# Altium PCB Switch_Matrix_32_2.PCBDOC (part 9 of 9)
Units mm, origin at the board's own origin, x right, y up, seen from the top; angles counter-clockwise.
Board outline 222.54 x 100 mm, 6 copper layers (L1, P2, L3, P4, L5, L6), stack 1.61 mm thick; 629 components, 583 nets, 2332 pads, 825 vias.
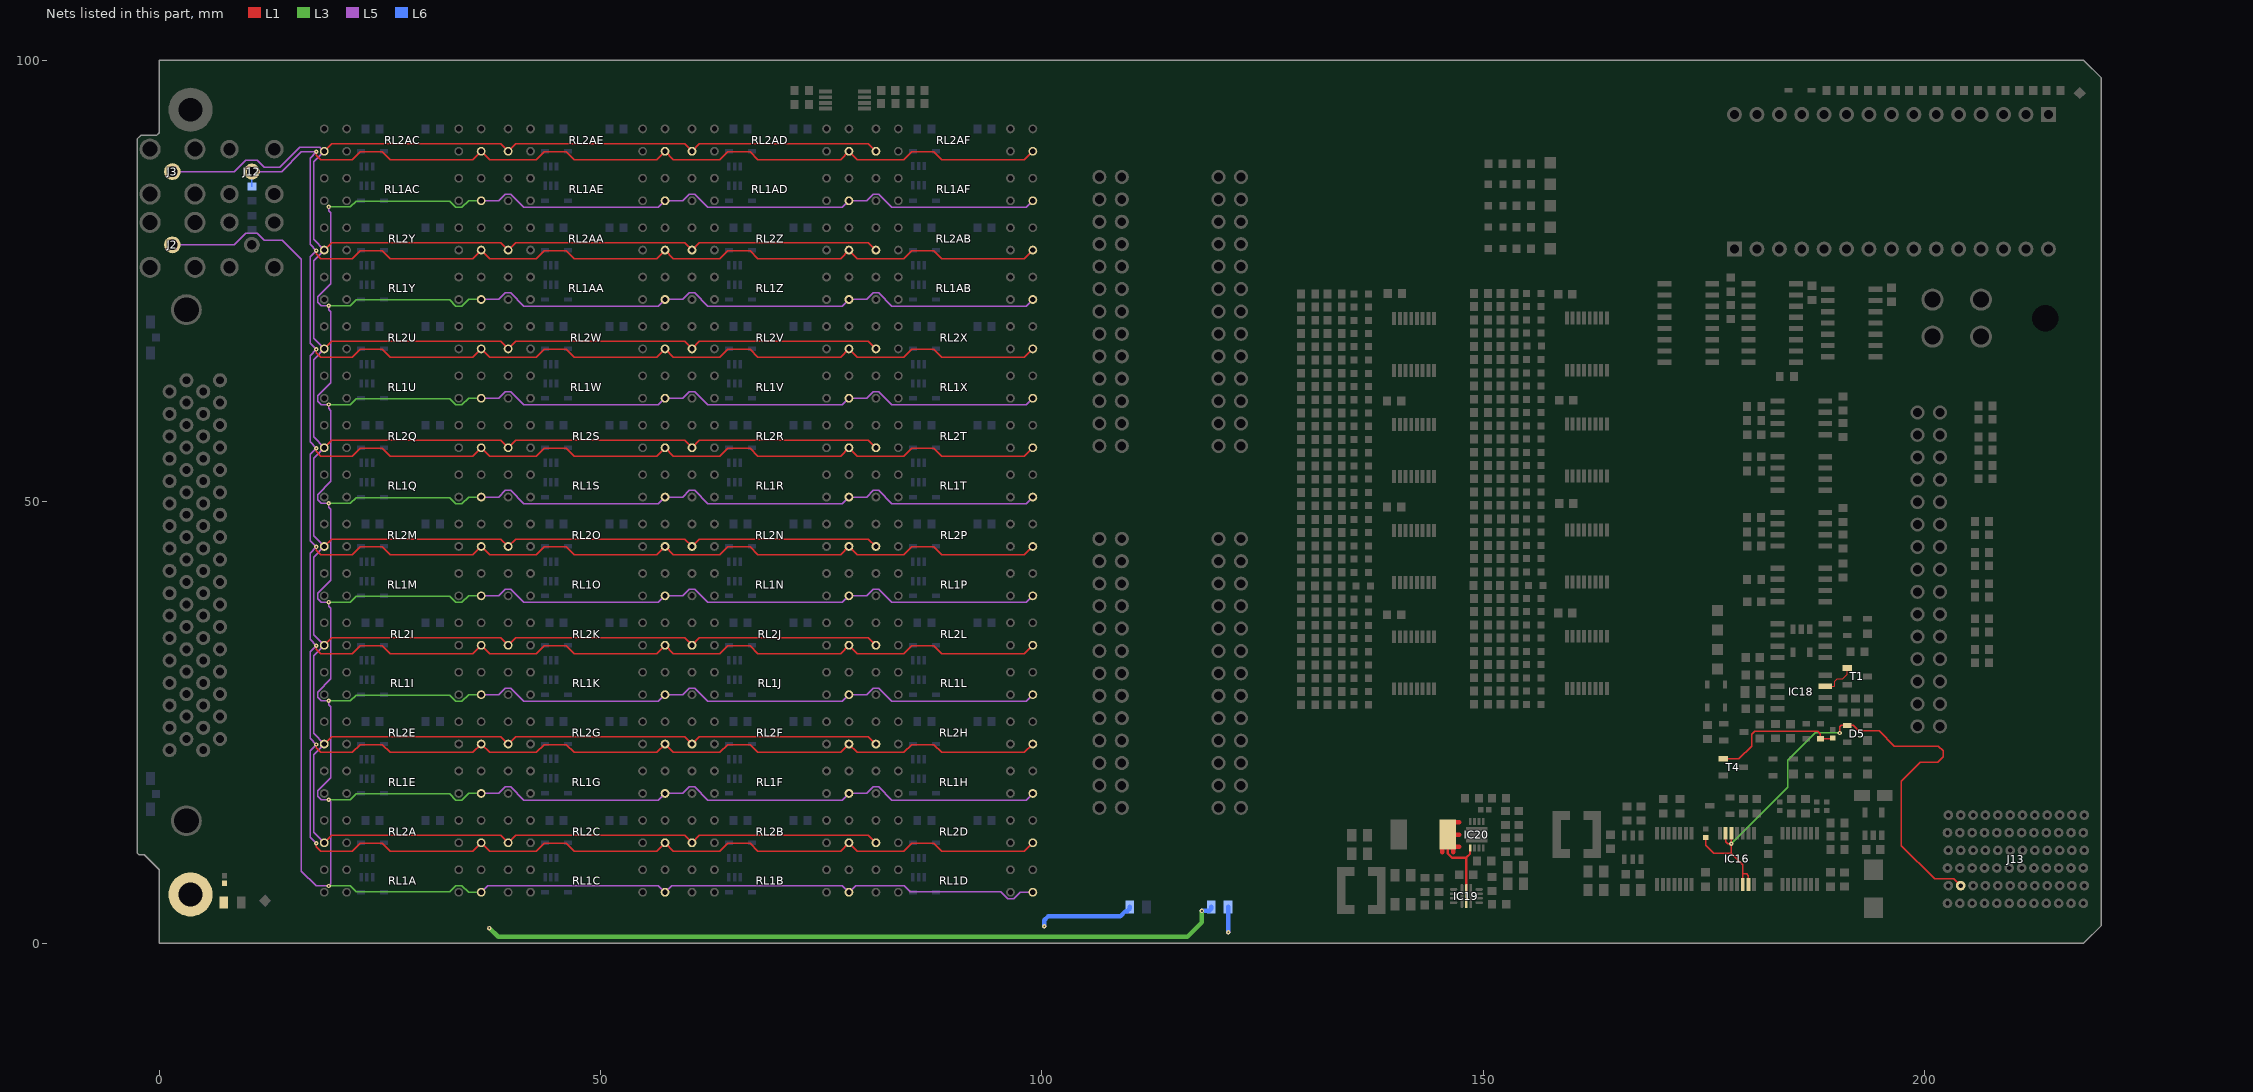
[diagram p12: the nets of this part, all layers, seen from the top]

## Via types
v1: diameter 0.5, hole 0.2, L1 to L6, tented both sides, 775 vias
v2: diameter 0.7, hole 0.4, L1 to L6, tented both sides, 41 vias
v3: diameter 0.5, hole 0.2, L1 to L6, 5 vias
v4: diameter 0.6, hole 0.3, L1 to L6, tented both sides, 4 vias

## Nets (pads, with @x,y where several pads share a name; then routed paths per layer and width w, separated by ;. In a path a pad name is that pad's centre, name@x,y a point inside that pad or via, vN(x,y) a via of type N, cw(c..) or ccw(c..) an arc to the next point about the centre after c; other vN are vias at no path point) (continued)
PORT_NB: J12.1 R100.2 RL2A.4 RL2AA.4 RL2AB.4 RL2AC.4 RL2AD.4 RL2AE.4 RL2AF.4 RL2B.4 RL2C.4 RL2D.4 RL2E.4 RL2F.4 RL2G.4 RL2H.4 RL2I.4 RL2J.4 RL2K.4 RL2L.4 RL2M.4 RL2N.4 RL2O.4 RL2P.4 RL2Q.4 RL2R.4 RL2S.4 RL2T.4 RL2U.4 RL2V.4 RL2W.4 RL2X.4 RL2Y.4 RL2Z.4 | length 792.6
  L1 w0.152: v1(17.803,11.3) 17.803,10.928 18.332,10.4 21.864,10.4 22.764,11.3 25.264,11.3 26.164,10.4 35.518,10.4 RL2A.4@36.474,11.356 37.43,10.4 42.7,10.4 43.6,11.3 46.1,11.3 47,10.4 56.354,10.4 RL2C.4@57.31,11.356 58.266,10.4 63.536,10.4 64.436,11.3 66.936,11.3 67.836,10.4 77.19,10.4 RL2B.4@78.146,11.356 79.102,10.4 84.372,10.4 85.272,11.3 87.772,11.3 88.672,10.4 98.026,10.4 RL2D.4@98.982,11.356 ; v1(17.803,22.492) 17.803,22.12 18.332,21.592 21.864,21.592 22.764,22.492 25.264,22.492 26.164,21.592 35.518,21.592 RL2E.4@36.474,22.548 37.43,21.592 42.7,21.592 43.6,22.492 46.1,22.492 47,21.592 56.354,21.592 RL2G.4@57.31,22.548 58.266,21.592 63.536,21.592 64.436,22.492 66.936,22.492 67.836,21.592 77.19,21.592 RL2F.4@78.146,22.548 79.102,21.592 84.372,21.592 85.272,22.492 87.772,22.492 88.672,21.592 98.026,21.592 RL2H.4@98.982,22.548 ; v1(17.803,33.684) 17.803,33.312 18.332,32.784 21.864,32.784 22.764,33.684 25.264,33.684 26.164,32.784 35.518,32.784 RL2I.4@36.474,33.74 37.43,32.784 42.7,32.784 43.6,33.684 46.1,33.684 47,32.784 56.354,32.784 RL2K.4@57.31,33.74 58.266,32.784 63.536,32.784 64.436,33.684 66.936,33.684 67.836,32.784 77.19,32.784 RL2J.4@78.146,33.74 79.102,32.784 84.372,32.784 85.272,33.684 87.772,33.684 88.672,32.784 98.026,32.784 RL2L.4@98.982,33.74 ; v1@17.803,44.875 17.803,44.504 18.332,43.976 21.864,43.976 22.764,44.876 25.264,44.876 26.164,43.976 35.518,43.976 RL2M.4@36.474,44.932 37.43,43.976 42.7,43.976 43.6,44.876 46.1,44.876 47,43.976 56.354,43.976 RL2O.4@57.31,44.932 58.266,43.976 63.536,43.976 64.436,44.876 66.936,44.876 67.836,43.976 77.19,43.976 RL2N.4@78.146,44.932 79.102,43.976 84.372,43.976 85.272,44.876 87.772,44.876 88.672,43.976 98.026,43.976 RL2P.4@98.982,44.932 ; v1(17.803,56.068) 17.803,55.696 18.332,55.168 21.864,55.168 22.764,56.068 25.264,56.068 26.164,55.168 35.518,55.168 RL2Q.4@36.474,56.124 37.43,55.168 42.7,55.168 43.6,56.068 46.1,56.068 47,55.168 56.354,55.168 RL2S.4@57.31,56.124 58.266,55.168 63.536,55.168 64.436,56.068 66.936,56.068 67.836,55.168 77.19,55.168 RL2R.4@78.146,56.124 79.102,55.168 84.372,55.168 85.272,56.068 87.772,56.068 88.672,55.168 98.026,55.168 RL2T.4@98.982,56.124 ; v1(17.803,67.26) 17.803,66.888 18.332,66.36 21.864,66.36 22.764,67.26 25.264,67.26 26.164,66.36 35.518,66.36 RL2U.4@36.474,67.316 37.43,66.36 42.7,66.36 43.6,67.26 46.1,67.26 47,66.36 56.354,66.36 RL2W.4@57.31,67.316 58.266,66.36 63.536,66.36 64.436,67.26 66.936,67.26 67.836,66.36 77.19,66.36 RL2V.4@78.146,67.316 79.102,66.36 84.372,66.36 85.272,67.26 87.772,67.26 88.672,66.36 98.026,66.36 RL2X.4@98.982,67.316 ; v1(17.803,78.452) 17.803,78.08 18.332,77.552 21.864,77.552 22.764,78.452 25.264,78.452 26.164,77.552 35.518,77.552 RL2Y.4@36.474,78.508 37.43,77.552 42.7,77.552 43.6,78.452 46.1,78.452 47,77.552 56.354,77.552 RL2AA.4@57.31,78.508 58.266,77.552 63.536,77.552 64.436,78.452 66.936,78.452 67.836,77.552 77.19,77.552 RL2Z.4@78.146,78.508 79.102,77.552 84.372,77.552 85.272,78.452 87.772,78.452 88.672,77.552 98.026,77.552 RL2AB.4@98.982,78.508 ; v1(17.803,89.644) 17.803,89.272 18.332,88.744 21.864,88.744 22.764,89.644 25.264,89.644 26.164,88.744 35.518,88.744 RL2AC.4@36.474,89.7 37.43,88.744 42.7,88.744 43.6,89.644 46.1,89.644 47,88.744 56.354,88.744 RL2AE.4@57.31,89.7 58.266,88.744 63.536,88.744 64.436,89.644 66.936,89.644 67.836,88.744 77.19,88.744 RL2AD.4@78.146,89.7 79.102,88.744 84.372,88.744 85.272,89.644 87.772,89.644 88.672,88.744 98.026,88.744 RL2AF.4@98.982,89.7
  L5 w0.152: J12.1@10.5,87.4 13.867,87.4 16.111,89.644 v1(17.803,89.644) 17.095,88.935 17.095,79.16 v1(17.803,78.452) 17.095,77.743 17.095,67.968 v1(17.803,67.26) 17.095,66.551 17.095,56.776 v1(17.803,56.068) 17.095,55.359 17.095,45.584 v1(17.803,44.876) 17.095,44.167 17.095,34.392 v1(17.803,33.684) 17.095,32.975 17.095,23.2 v1(17.803,22.492) 17.095,21.783 17.095,12.008 v1(17.803,11.3)
  L6 w0.152: R100.2@10.5,85.7 J12.1@10.5,87.4
PORT_PA: J2.1 RL1A.4 RL1AA.4 RL1AB.4 RL1AC.4 RL1AD.4 RL1AE.4 RL1AF.4 RL1B.4 RL1C.4 RL1D.4 RL1E.4 RL1F.4 RL1G.4 RL1H.4 RL1I.4 RL1J.4 RL1K.4 RL1L.4 RL1M.4 RL1N.4 RL1O.4 RL1P.4 RL1Q.4 RL1R.4 RL1S.4 RL1T.4 RL1U.4 RL1V.4 RL1W.4 RL1X.4 RL1Y.4 RL1Z.4 | length 850.6
  L5 w0.152: J2.1@1.5,79.1 8.5,79.1 9.8,80.4 11.1,80.4 11.9,79.6 13.96,79.6 16.1,77.46 16.1,8.14 17.775,6.466 v1(19.215,6.466) ; v1@19.215,6.502 19.442,6.729 19.442,15.983 19.215,16.21 v1(19.215,16.246) 18.354,16.246 17.959,16.641 17.959,17.241 19.442,18.723 19.442,26.758 19.215,26.985 v1(19.215,27.438) 18.354,27.438 17.959,27.833 17.959,28.433 19.442,29.915 19.442,37.95 19.215,38.177 v1(19.215,38.63) 18.354,38.63 17.959,39.025 17.959,39.625 19.442,41.107 19.442,49.142 19.215,49.369 v1(19.215,49.822) 18.354,49.822 17.959,50.217 17.959,50.817 19.442,52.299 19.442,60.334 19.215,60.561 v1(19.215,61.014) 18.354,61.014 17.959,61.409 17.959,62.009 19.442,63.491 19.442,71.526 19.215,71.753 v1(19.215,72.206) 18.354,72.206 17.959,72.601 17.959,73.201 19.442,74.683 19.442,82.718 19.215,82.945 v1(19.215,83.398) ; RL1A.4@36.474,5.76 37.218,6.504 56.566,6.504 RL1C.4@57.31,5.76 58.05,6.5 77.406,6.5 RL1B.4@78.146,5.76 78.89,6.504 84.396,6.504 85.1,5.8 95.347,5.8 96.139,5.008 96.808,5.008 97.56,5.76 RL1D.4@98.982,5.76 ; RL1E.4@36.474,16.952 38.464,16.952 39.208,17.696 39.823,17.696 41.319,16.2 56.558,16.2 RL1G.4@57.31,16.952 59.3,16.952 60.044,17.696 60.659,17.696 62.155,16.2 77.394,16.2 RL1F.4@78.146,16.952 80.136,16.952 80.88,17.696 81.495,17.696 82.991,16.2 98.23,16.2 RL1H.4@98.982,16.952 ; RL1I.4@36.474,28.144 38.464,28.144 39.208,28.888 39.823,28.888 41.319,27.392 56.558,27.392 RL1K.4@57.31,28.144 59.3,28.144 60.044,28.888 60.659,28.888 62.155,27.392 77.394,27.392 RL1J.4@78.146,28.144 80.136,28.144 80.88,28.888 81.495,28.888 82.991,27.392 98.23,27.392 RL1L.4@98.982,28.144 ; RL1M.4@36.474,39.336 38.464,39.336 39.208,40.08 39.823,40.08 41.319,38.584 56.558,38.584 RL1O.4@57.31,39.336 59.3,39.336 60.044,40.08 60.659,40.08 62.155,38.584 77.394,38.584 RL1N.4@78.146,39.336 80.136,39.336 80.88,40.08 81.495,40.08 82.991,38.584 98.23,38.584 RL1P.4@98.982,39.336 ; RL1Q.4@36.474,50.528 38.464,50.528 39.208,51.272 39.823,51.272 41.319,49.776 56.558,49.776 RL1S.4@57.31,50.528 59.3,50.528 60.044,51.272 60.659,51.272 62.155,49.776 77.394,49.776 RL1R.4@78.146,50.528 80.136,50.528 80.88,51.272 81.495,51.272 82.991,49.776 98.23,49.776 RL1T.4@98.982,50.528 ; RL1U.4@36.474,61.72 38.464,61.72 39.208,62.464 39.823,62.464 41.319,60.968 56.558,60.968 RL1W.4@57.31,61.72 59.3,61.72 60.044,62.464 60.659,62.464 62.155,60.968 77.394,60.968 RL1V.4@78.146,61.72 80.136,61.72 80.88,62.464 81.495,62.464 82.991,60.968 98.23,60.968 RL1X.4@98.982,61.72 ; RL1Y.4@36.474,72.912 38.464,72.912 39.208,73.656 39.823,73.656 41.319,72.16 56.558,72.16 RL1AA.4@57.31,72.912 59.3,72.912 60.044,73.656 60.659,73.656 62.155,72.16 77.394,72.16 RL1Z.4@78.146,72.912 80.136,72.912 80.88,73.656 81.495,73.656 82.991,72.16 98.23,72.16 RL1AB.4@98.982,72.912 ; RL1AC.4@36.474,84.104 38.464,84.104 39.208,84.848 39.823,84.848 41.319,83.352 56.558,83.352 RL1AE.4@57.31,84.104 59.3,84.104 60.044,84.848 60.659,84.848 62.155,83.352 77.394,83.352 RL1AD.4@78.146,84.104 80.136,84.104 80.88,84.848 81.495,84.848 82.991,83.352 98.23,83.352 RL1AF.4@98.982,84.104
  L3 w0.152: v1(19.215,6.466) 21.646,6.466 22.3,5.812 32.9,5.812 33.6,6.512 34.3,6.512 35.052,5.76 RL1A.4@36.474,5.76 ; v1(19.215,16.246) 21.646,16.246 22.3,16.9 32.9,16.9 33.6,16.2 34.3,16.2 35.052,16.952 RL1E.4@36.474,16.952 ; v1(19.215,27.438) 21.646,27.438 22.3,28.092 32.9,28.092 33.6,27.392 34.3,27.392 35.052,28.144 RL1I.4@36.474,28.144 ; v1(19.215,38.63) 21.646,38.63 22.3,39.284 32.9,39.284 33.6,38.584 34.3,38.584 35.052,39.336 RL1M.4@36.474,39.336 ; v1(19.215,49.822) 21.646,49.822 22.3,50.476 32.9,50.476 33.6,49.776 34.3,49.776 35.052,50.528 RL1Q.4@36.474,50.528 ; v1(19.215,61.014) 21.646,61.014 22.3,61.668 32.9,61.668 33.6,60.968 34.3,60.968 35.052,61.72 RL1U.4@36.474,61.72 ; v1(19.215,72.206) 21.646,72.206 22.3,72.86 32.9,72.86 33.6,72.16 34.3,72.16 35.052,72.912 RL1Y.4@36.474,72.912 ; v1(19.215,83.398) 21.646,83.398 22.3,84.052 32.9,84.052 33.6,83.352 34.3,83.352 35.052,84.104 RL1AC.4@36.474,84.104
PORT_PB: J3.1 RL2A.1 RL2AA.1 RL2AB.1 RL2AC.1 RL2AD.1 RL2AE.1 RL2AF.1 RL2B.1 RL2C.1 RL2D.1 RL2E.1 RL2F.1 RL2G.1 RL2H.1 RL2I.1 RL2J.1 RL2K.1 RL2L.1 RL2M.1 RL2N.1 RL2O.1 RL2P.1 RL2Q.1 RL2R.1 RL2S.1 RL2T.1 RL2U.1 RL2V.1 RL2W.1 RL2X.1 RL2Y.1 RL2Z.1 | length 621.4
  L1 w0.152: RL2A.1@18.694,11.356 19.538,12.2 38.686,12.2 RL2C.1@39.53,11.356 40.374,12.2 59.522,12.2 RL2B.1@60.366,11.356 61.21,12.2 80.358,12.2 RL2D.1@81.202,11.356 ; RL2E.1@18.694,22.548 19.538,23.392 38.686,23.392 RL2G.1@39.53,22.548 40.374,23.392 59.522,23.392 RL2F.1@60.366,22.548 61.21,23.392 80.358,23.392 RL2H.1@81.202,22.548 ; RL2I.1@18.694,33.74 19.538,34.584 38.686,34.584 RL2K.1@39.53,33.74 40.374,34.584 59.522,34.584 RL2J.1@60.366,33.74 61.21,34.584 80.358,34.584 RL2L.1@81.202,33.74 ; RL2M.1@18.694,44.932 19.538,45.776 38.686,45.776 RL2O.1@39.53,44.932 40.374,45.776 59.522,45.776 RL2N.1@60.366,44.932 61.21,45.776 80.358,45.776 RL2P.1@81.202,44.932 ; RL2Q.1@18.694,56.124 19.538,56.968 38.686,56.968 RL2S.1@39.53,56.124 40.374,56.968 59.522,56.968 RL2R.1@60.366,56.124 61.21,56.968 80.358,56.968 RL2T.1@81.202,56.124 ; RL2U.1@18.694,67.316 19.538,68.16 38.686,68.16 RL2W.1@39.53,67.316 40.374,68.16 59.522,68.16 RL2V.1@60.366,67.316 61.21,68.16 80.358,68.16 RL2X.1@81.202,67.316 ; RL2Y.1@18.694,78.508 19.538,79.352 38.686,79.352 RL2AA.1@39.53,78.508 40.374,79.352 59.522,79.352 RL2Z.1@60.366,78.508 61.21,79.352 80.358,79.352 RL2AB.1@81.202,78.508 ; RL2AC.1@18.694,89.7 19.538,90.544 38.686,90.544 RL2AE.1@39.53,89.7 40.374,90.544 59.522,90.544 RL2AD.1@60.366,89.7 61.21,90.544 80.358,90.544 RL2AF.1@81.202,89.7
  L5 w0.152: J3.1@1.5,87.4 8.5,87.4 9.8,88.7 11.1,88.7 11.9,87.9 13.646,87.9 15.898,90.152 18.212,90.152 18.664,89.7 RL2AC.1@18.694,89.7 17.483,88.489 17.483,79.719 RL2Y.1@18.694,78.508 17.483,77.297 17.483,68.527 RL2U.1@18.694,67.316 17.483,66.105 17.483,57.335 RL2Q.1@18.694,56.124 17.483,54.913 17.483,46.143 RL2M.1@18.694,44.932 17.483,43.721 17.483,34.951 RL2I.1@18.694,33.74 17.483,32.529 17.483,23.759 RL2E.1@18.694,22.548 17.483,21.337 17.483,12.567 RL2A.1@18.694,11.356
RST: IC18.3 T1.1 | length 4.1
  L1 w0.127: IC18.3@188.751,29.085 189.776,29.085 189.851,29.16 189.851,29.685 190.116,29.95 190.75,29.95 191.25,30.45 T1.1@191.25,31.15
RSTn: D8.1 R133.1 T4.1 | length 15.2
  L1 w0.152: T4.1@177.2,20.875 178.975,20.875 180.4,22.3 180.4,23.628 180.756,23.985 187.915,23.985 188.2,23.7 D8.1@188.2,23.15 189.52,23.15 R133.1@189.6,23.23
SERVMOD_3V3: D5.3 IC16.5 IC16.6 IC16.12 IC16.13 J13.K2 R85.2 | length 69.4
  L1 w0.152: R85.2@175.2,11.96 175.2,11.1 176.11,10.19 178.109,10.19 ; IC16.6@177.459,12.465 IC16.6@177.459,12.448 177.459,11.465 177.684,11.24 v1(178.109,11.24) ; IC16.5@178.109,12.465 IC16.5@178.109,12.448 v1(178.109,11.24) ; IC16.12@179.409,6.648 179.409,7.873 ; IC16.13@180.059,6.648 180.059,7.648 179.834,7.873 179.409,7.873 ; v1(190.4,23.8) 190.4,24.5 190.55,24.65 D5.3@191.25,24.65 191.95,24.65 192.564,24.036 194.863,24.036 196.579,22.32 201.58,22.32 202.1,21.8 202.1,21.114 201.486,20.5 199.538,20.5 197.391,18.354 197.391,11.03 201.144,7.277 203.323,7.277 J13.K2@204.1,6.5 ; 178.109,10.19 v1(178.109,11.24) ; 178.109,10.19 179.409,8.89 179.409,7.873
  L3 w0.152: v1(178.109,11.24) 184.5,17.631 184.5,20.7 187.6,23.8 v1(190.4,23.8)
STRIP1: B7.1 C212.1 R120.2 R126.1 | length 84.5
  L3 w0.508: v1(37.4,1.7) 38.4,0.7 116.5,0.7 118.132,2.332 v1(118.132,3.643)
  L6 w0.508: v1(118.132,3.643) 118.954,3.643 119.2,3.889 R120.2@119.2,4.1
STRIP2: R119.1 | length 11.1
  L6 w0.508: v1(100.276,1.907) 100.276,2.593 100.701,3.018 108.868,3.018 109.479,3.629 109.704,3.629 109.95,3.875 R119.1@109.95,4.1
STRIP3: R120.1 | length 2.9
  L6 w0.508: R120.1@121.1,4.1 121.1,1.244 v1(121.115,1.229)
Sw_8V0: IC19.2 IC20.1 L1.1 | length 15.7
  L1 w0.254: L1.1@145.992,12.293 145.992,10.143 146.478,9.657 148.092,9.657 ; 148.092,9.689 148.52,10.117 IC20.1@148.52,10.75
  L1 w0.3: IC19.2@148.092,5.325 148.092,9.657
  L1 w0.508: 145.38,10.262 L1.1@145.38,11.762 ; L1.1@145.792,12.293 147.292,12.293 ; L1.1@146.304,10.918 147.31,10.918 ; L1.1@146.304,13.668 147.31,13.668 ; 146.604,10.262 L1.1@146.604,10.918
pads on no net: B1.1 D6.2 FTG1.FTG2 FTG2.1 FTG3.1 FTG4.1 IC3.5 IC3.6 IC5.1 IC5.2 IC5.7 IC6.8 IC6.11 IC14.4 IC15.1 IC15.2 IC15.3 IC15.7 IC19.7 IC20.4 IC32.5 J10.5 J11.3 J11.7 J11.10 J11.11 J11.12 J11.13 J11.15 J13.A5 J13.B1 J13.B5 J13.B6 J13.C6 J13.D5 J13.E2 J13.E4 J13.E5 J13.F2 J13.F4 J13.G3 J13.H3 J13.H6 J13.I2 J13.I6 J13.J3 J13.K3 J13.K6 J13.L2 J13.L3 J13.L6 J14.1 J14.2 J14.3 J14.5 J14.6 J14.7 J14.8 J14.13 LD1.3 LD10.3

## Polygon pours and split planes (outlines as drawn)
GND on L6 "NONET_L-01_P-001" (solid, remove dead copper, pour order 68): 219.5,98 220.039,97.461 220.039,3.039 219.55,2.55 103.956,2.55 103.956,98
P3V3_MP on L6 "P3V3_MP_L06_P067" (solid, remove dead copper, pour order 67): 177.602,2.898 169.702,2.898 169.7,2.9 169.7,27.3 177.7,35.3 190.8,35.3 193.3,37.8 193.3,78.808 189.438,82.67 159.03,82.67 158.429,83.271 158.429,83.758 159.071,84.4 193.8,84.4 198.552,79.648 198.552,63.448 200.2,61.8 200.2,28.46 203,25.66 203,24.021 202.437,23.458 198.942,23.458 195.3,27.1 194.3,26.1 176,26.1 174.6,24.7 174.6,14.623 177.602,11.621
GND on L6 "GND_L06_P030" (solid, remove dead copper, pour order 30): 21.2,88.944 20.9,88.644 20.9,85.341 21.383,84.858 99,84.858 99,88.944
GND on L6 "GND_L06_P029" (solid, remove dead copper, pour order 29): 21.2,77.752 20.9,77.452 20.9,74.149 21.383,73.666 99,73.666 99,77.752
GND on L6 "GND_L06_P028" (solid, remove dead copper, pour order 28): 21.2,66.56 20.9,66.26 20.9,62.957 21.383,62.474 99,62.474 99,66.56
GND on L6 "GND_L06_P027" (solid, remove dead copper, pour order 27): 21.2,55.368 20.9,55.068 20.9,51.765 21.383,51.282 99,51.282 99,55.368
GND on L6 "GND_L06_P026" (solid, remove dead copper, pour order 26): 21.2,44.176 20.9,43.876 20.9,40.573 21.383,40.09 99,40.09 99,44.176
GND on L6 "GND_L06_P025" (solid, remove dead copper, pour order 25): 21.2,32.984 20.9,32.684 20.9,29.381 21.383,28.898 99,28.898 99,32.984
GND on L6 "GND_L06_P018" (solid, remove dead copper, pour order 18): 21.2,21.792 20.9,21.492 20.9,18.189 21.383,17.706 99,17.706 99,21.792
STRIP2 on L6 "esd1" (solid, pour order 11): 83.487,0.962 100.554,0.962 100.554,2.231 45.554,2.231 45.554,0.962
P5V0A on L6 "P5V0A_L06_P050" (solid, remove dead copper, pour order 50): 97,2.9 97,6.081 97.174,6.255 106.955,6.255 107.5,6.8 122.7,6.8 124.5,5 127.8,5 131.8,9 131.8,13.4 134.6,13.4 136,12 136,2.6 122.242,2.6 122.226,2.584 122.226,4.674 121.8,5.1 118.5,5.1 117.7,4.3 117.7,2.6 113.5,2.6 113.5,4.6 113,5.1 109.3,5.1 107.7,3.5 100.3,3.5 99.698,2.898 99,2.898
STRIP3 on L6 "STRIP3_L06_P000" (solid, pour order 0): 218.087,0.962 218.104,0.962 219.344,2.202 120.554,2.202 120.554,0.962
P3V3_DIOT on L6 "P3V3_DIOT_L06_P066" (solid, remove dead copper, pour order 66): 192.8,28.1 190.8,26.1 177.975,26.1 176.128,27.946 175.046,27.946 174.6,27.5 174.6,14.7 177.6,11.7 177.6,2.9 177.602,2.898 196.402,2.898 196.402,23.602 197.5,24.7 194.7,27.5 194.7,32 194.1,32.6 193.1,32.6 192.8,32.3
P12V0 on L6 "P12V0_L06_P059" (solid, remove dead copper, pour order 59): 198.4,2.898 196.402,2.898 196.4,2.9 196.4,23.6 198.157,25.357 199.952,25.357 200.373,24.936 200.373,23.92 200.835,23.458 202.437,23.458 202.974,23.995 202.974,25.233 201.95,26.257 200.513,26.257 200.497,26.273 200.497,28.097 200.497,62.103 198.8,63.8 198.8,75 208.7,75 210.7,73 210.7,31 206.3,26.6 206.3,22.7 205.355,21.755 200.523,21.755 199.942,21.174 199.942,8.282 201.2,7.024 201.2,2.9
GND on L6 "GND_L06_P054" (solid, remove dead copper, pour order 54): 98.5,88.9 98.5,90.844 103.956,96.3 125.5,96.3 130.7,91.1 130.7,77 133.2,74.5 147.9,74.5 148.9,73.5 148.9,27.2 146.5,24.8 132.9,24.8 131.5,23.4 131.5,9.2 127.4,5.1 98.2,5.1
P12V0 on L6 "NONET_L-01_P-001" (solid, remove dead copper, pour order 58): 219.5,7.8 220,7.3 220,3 219.1,2.1 198.4,2.1 198.4,7.8
P13V0_SCSI on L6 "P13V0_SCSI_L06_P032" (solid, remove dead copper, pour order 32): 122.557,46.596 107.317,46.596 107.083,46.362 107.083,43.2 122.501,43.2 123.775,44.474 123.775,46 123.179,46.596
P5V0A on L6 "P5V0A_L06_P031" (solid, remove dead copper, pour order 31): 301 vertices, not listed, extent 14.7,2.8 99,91.344
GND on L6 "GND_L06_P013" (solid, remove dead copper, pour order 13): 21.2,10.6 20.9,10.3 20.9,6.997 21.383,6.514 99,6.514 99,10.6
STRIP1 on L6 "esd1" (solid, pour order 3): 0.804,6.452 7.929,6.452 7.929,2.512 40.554,2.512 40.554,1.012 0.804,1.012
GND on L1 "NONET_L-01_P-001" (solid, remove dead copper, pour order 65): 123.8,97.6 219.7,97.6 219.7,2.6 123.8,2.6
P3V3 on L1 "P3V3_L01_P064" (solid, remove dead copper, pour order 64): 162.4,5.308 162.4,9 162.2,9.2 160.1,9.2 159.85,9.45 159.85,14.943 157.143,14.943 156.6,14.4 156.6,5.655 157.044,5.21 162.302,5.21
P12V0 on L1 "P12V0_L01_P063" (solid, remove dead copper, pour order 63): 148.825,9.8 148.825,8.925 148.417,8.517 148.417,6.575 148.742,6.25 148.742,6.209 149.534,7 150.1,7 150.3,6.8 151.6,6.8 151.8,6.6 151.8,5.7 152.4,5.1 153.6,5.1 153.9,4.8 153.9,3.7 153.761,3.561 149.939,3.561 149.7,3.8 149.171,3.8 148.729,4.242 148.484,4.242 148.484,4.141 148.442,4.1 148.442,2.569 148.474,2.537 217.3,2.537 217.3,4.945 156.873,4.945 156.118,5.7 154.1,5.7 153.851,5.949 153.851,9.279 153.506,9.625 152.297,9.625 151.99,9.318 151.99,8.699 151.831,8.54 150.144,8.54 149.775,8.909 149.775,9.8
GND on L1 "GND_L01_P062" (solid, remove dead copper, pour order 62): 148.045,13.125 148.045,11.375 150.495,11.375 150.495,10.495 150.425,10.425 150.425,8.8 151.375,8.8 151.7,9.125 151.7,12.8 151.375,13.125 150.495,13.125
Sw_8V0 on L1 "SW_8V0_L01_P061" (solid, remove dead copper, pour order 61): 145.067,13.993 145.067,9.333 145.7,8.7 147.512,8.7 147.999,8.213 148.234,8.447 148.234,8.775 148.67,9.211 148.67,11.15 148.37,11.15 148.37,10.35 147.85,10.35 147.6,10.6 147.6,13.8 147.4,14 147.393,13.993 146.917,13.993
NetC11_2 on L1 "NETC11_2_L01_P060" (solid, remove dead copper, pour order 60): 136.725,3.307 140.525,3.307 140.525,8.702 140.829,9.002 141.367,9.533 141.367,15.7 138.45,15.7 136.725,13.975
P5V0A on L1 "P5V0A_L01_P052" (solid, remove dead copper, pour order 52): 135.625,3.307 132.593,3.307 131.7,4.2 131.7,13 132.7,14 135.6,14 135.625,13.975
P13V0_SCSI on L1 "P13V0_SCSI_L01_P015" (solid, remove dead copper, pour order 15): 135.5,24.386 135.5,20.017 135.238,19.755 123.8,19.755 123.8,43.626 123.212,44.214 121.486,44.214 120.961,44.739 120.961,52.866 123.729,55.634 123.729,84.693 123.169,85.253 108.019,85.253 107.444,85.828 107.444,90.2 127.867,90.2 127.867,26.133 129.3,24.7 135.186,24.7
STRIP1 on L1 "esd1" (solid, pour order 10): 0.804,7.037 7.929,7.037 7.929,2.512 40.554,2.512 40.554,1.012 0.804,1.012
STRIP3 on L1 "STRIP3_L01_P014" (solid, pour order 14): 218.087,0.962 218.104,0.962 219.344,2.202 120.554,2.202 120.554,0.962
STRIP2 on L1 "esd1" (solid, pour order 7): 83.487,0.962 100.554,0.962 100.554,2.231 45.554,2.231 45.554,0.962
GND on L3 "tgr" (solid, remove dead copper, pour order 69): 104.2,98 104.2,87.6 127.8,87.6 127.8,12.967 117.465,12.967 107.398,2.9 127.8,2.9 219.7,2.9 219.7,97.8 219.5,98
N13V0_SCSI on L3 "N13V0_SCSI_L03_P008" (solid, remove dead copper, pour order 8): 127.867,26.133 127.867,12.967 125.1,10.2 114.7,10.2 107.2,2.7 12.3,2.7 8.4,2.7 8.4,6.8 5.2,10 -1.7,10 -2.5,10 -2.5,46.504 2.705,46.504 4.38,44.829 4.38,42.197 2.388,40.204 0.614,40.197 0.614,21.879 17.093,5.4 104.3,5.4 112.9,14 122.739,14 123.8,15.061 123.8,43.626 123.212,44.214 119.186,44.214 118.2,45.2 118.2,50.105 123.729,55.634 123.729,84.693 123.169,85.253 111.974,85.253 111.027,86.2 104.7,86.2 104.2,86.7 104.2,90 125.6,90 127.867,87.733
P3V3 on L3 "P3V3_L03_P053" (solid, remove dead copper, pour order 53): 160.9,5.1 157.211,5.1 156.555,5.755 156.555,20.645 153.9,23.3 141.5,23.3 138.8,26 138.8,72.48 139.02,72.7 144.5,72.7 145,72.2 145,34.17 146.17,33 156.7,33 158.1,34.4 158.1,72 158.9,72.8 163.6,72.8 164.5,71.9 164.5,33.568 165.568,32.5 173.1,32.5 181,40.4 181,70.9 182.7,72.6 182.7,74.2 185.337,76.837 185.337,77.308 185.052,77.593 183.693,77.593 181.2,75.1 178.7,75.1 178.52,75.28 178.52,75.602 178.715,75.797 180.697,75.797 181.797,76.897 181.797,80.103 183.088,81.395 196.505,81.395 198.1,79.8 198.1,75.3 195.4,72.6 187.2,72.6 186.3,71.7 186.3,36 176.3,26 167.979,26 167.702,25.723 167.702,20.398 169.6,18.5 180.268,18.5 181.298,17.469 181.298,17.154 181.145,17 180.825,17 180.025,17.8 169.5,17.8 162.8,11.1 162.8,5.8 162.1,5.1
GND on L5 "GND_L05_P081" (solid, remove dead copper, pour order 81): 18.34,91.16 25.9,91.16 26.1,90.96 35.6,90.96 35.8,91.16 46.736,91.16 46.936,90.96 56.436,90.96 56.636,91.16 67.572,91.16 67.772,90.96 77.272,90.96 77.472,91.16 88.408,91.16 88.608,90.96 98.108,90.96 98.308,91.16 99.3,91.16 99.9,91.76 99.9,93.06 99.4,93.56 18.36,93.56 17.8,93 17.8,91.7
GND on L5 "GND_L05_P080" (solid, remove dead copper, pour order 80): 18.32,79.968 25.9,79.968 26.1,79.768 35.6,79.768 35.8,79.968 46.736,79.968 46.936,79.768 56.436,79.768 56.636,79.968 67.572,79.968 67.772,79.768 77.272,79.768 77.472,79.968 88.408,79.968 88.608,79.768 98.108,79.768 98.308,79.968 99.3,79.968 99.9,80.568 99.9,81.868 99.4,82.368 20.423,82.368 19.9,81.845 18.32,81.845
GND on L5 "GND_L05_P079" (solid, remove dead copper, pour order 79): 18.32,68.776 25.9,68.776 26.1,68.576 35.6,68.576 35.8,68.776 46.736,68.776 46.936,68.576 56.436,68.576 56.636,68.776 67.572,68.776 67.772,68.576 77.272,68.576 77.472,68.776 88.408,68.776 88.608,68.576 98.108,68.576 98.308,68.776 99.3,68.776 99.9,69.376 99.9,70.676 99.4,71.176 20.423,71.176 19.9,70.653 18.32,70.653
GND on L5 "GND_L05_P078" (solid, remove dead copper, pour order 78): 18.32,57.584 25.9,57.584 26.1,57.384 35.6,57.384 35.8,57.584 46.736,57.584 46.936,57.384 56.436,57.384 56.636,57.584 67.572,57.584 67.772,57.384 77.272,57.384 77.472,57.584 88.408,57.584 88.608,57.384 98.108,57.384 98.308,57.584 99.3,57.584 99.9,58.184 99.9,59.484 99.4,59.984 20.423,59.984 19.9,59.461 18.32,59.461
GND on L5 "GND_L05_P077" (solid, remove dead copper, pour order 77): 18.32,46.392 25.9,46.392 26.1,46.192 35.6,46.192 35.8,46.392 46.736,46.392 46.936,46.192 56.436,46.192 56.636,46.392 67.572,46.392 67.772,46.192 77.272,46.192 77.472,46.392 88.408,46.392 88.608,46.192 98.108,46.192 98.308,46.392 99.3,46.392 99.9,46.992 99.9,48.292 99.4,48.792 20.423,48.792 19.9,48.269 18.32,48.269
GND on L5 "GND_L05_P076" (solid, remove dead copper, pour order 76): 18.32,12.816 25.9,12.816 26.1,12.616 35.6,12.616 35.8,12.816 46.736,12.816 46.936,12.616 56.436,12.616 56.636,12.816 67.572,12.816 67.772,12.616 77.272,12.616 77.472,12.816 88.408,12.816 88.608,12.616 98.108,12.616 98.308,12.816 99.3,12.816 99.9,13.416 99.9,14.716 99.4,15.216 20.423,15.216 19.9,14.693 18.32,14.693
GND on L5 "GND_L05_P075" (solid, remove dead copper, pour order 75): 18.32,24.008 25.9,24.008 26.1,23.808 35.6,23.808 35.8,24.008 46.736,24.008 46.936,23.808 56.436,23.808 56.636,24.008 67.572,24.008 67.772,23.808 77.272,23.808 77.472,24.008 88.408,24.008 88.608,23.808 98.108,23.808 98.308,24.008 99.3,24.008 99.9,24.608 99.9,25.908 99.4,26.408 20.423,26.408 19.9,25.885 18.32,25.885
GND on L5 "GND_L05_P074" (solid, remove dead copper, pour order 74): 18.32,35.2 25.9,35.2 26.1,35 35.6,35 35.8,35.2 46.736,35.2 46.936,35 56.436,35 56.636,35.2 67.572,35.2 67.772,35 77.272,35 77.472,35.2 88.408,35.2 88.608,35 98.108,35 98.308,35.2 99.3,35.2 99.9,35.8 99.9,37.1 99.4,37.6 20.423,37.6 19.9,37.077 18.32,37.077
GND on L5 "NONET_L-01_P-001" (solid, remove dead copper, pour order 57): 137.7,99.8 217.5,99.8 219.8,97.5 219.8,2.4 137.7,2.4
N13V0_SCSI on L5 "N13V0_SCSI_L05_P056" (solid, remove dead copper, pour order 56): 106.517,46.596 121.757,46.596 121.992,46.362 121.992,43.2 106.574,43.2 105.3,44.474 105.3,46 105.896,46.596
P13V0_SCSI on L5 "P13V0_SCSI_L05_P002" (solid, remove dead copper, pour order 2): 5.599,44.829 5.599,42.197 8.2,39.596 8.2,2.6 137.4,2.6 137.4,24.65 133.051,24.65 131.806,23.406 131.806,9.406 127.3,4.9 98.9,4.9 80.8,4.9 16.7,4.9 14.3,7.3 14.3,43.5 11.296,46.504 7.274,46.504
GND on P4 (split plane): 219.528,97.789 219.528,2.211 217.828,0.51 0.51,0.51 0.51,8.3 0.501,8.4 0.472,8.495 0.424,8.584 0.361,8.661 -0.039,9.061 -1.339,10.361 -1.416,10.424 -1.505,10.472 -1.6,10.501 -1.7,10.51 -1.99,10.51 -1.99,90.889 -1.889,90.99 -0.3,90.99 -0.2,90.999 -0.105,91.028 -0.016,91.076 0.061,91.139 0.361,91.439 0.424,91.516 0.472,91.605 0.501,91.7 0.51,91.8 0.51,99.49 217.828,99.49
GND on P2 (split plane): 219.528,97.789 219.528,2.211 217.828,0.51 0.51,0.51 0.51,8.3 0.501,8.4 0.472,8.495 0.424,8.584 0.361,8.661 -0.039,9.061 -1.339,10.361 -1.416,10.424 -1.505,10.472 -1.6,10.501 -1.7,10.51 -1.99,10.51 -1.99,90.889 -1.889,90.99 -0.3,90.99 -0.2,90.999 -0.105,91.028 -0.016,91.076 0.061,91.139 0.361,91.439 0.424,91.516 0.472,91.605 0.501,91.7 0.51,91.8 0.51,99.49 217.828,99.49

## Keep-outs
L1:
  lines w0.1: 0.004,8.103 1,8.103 1.996,8.103 ccw(c1.996,8.61) 2.355,8.251 cw(c2.357,8.249) 2.357,8.252 4.09,8.252 cw(c4.09,6.025) 5.665,7.6 6.187,7.078 cw(c5.64,6.531) 6.413,6.531 ; 0.69,91.923 2,91.923 2.423,91.5 5.389,91.5 6.581,92.692 6.581,94 6.581,95 6.581,95.606 6.096,96.091 6.096,97.003
  lines w0.2: 8.229,2.537 219.3,2.537
  lines w0.254: 0.051,97.993 159.791,97.993 219.8,97.993 ; 8.188,2.612 8.188,6.8
L5:
  lines w0.2: 8.229,2.537 219.3,2.537
  lines w0.254: 0.051,97.993 159.791,97.993 219.593,97.993
L3:
  lines w0.2: 8.229,2.537 117.416,2.537 ; 118.937,2.537 219.3,2.537
  lines w0.254: 0.051,97.993 159.791,97.993 220.2,97.993
L6:
  lines w0.1: 1,8.103 2.35,8.103 2.538,8.29 4.975,8.29 6.413,6.852 6.413,4.256 6.096,3.939 6.096,2.855 6.414,2.537 8.229,2.537 ; 1,91.923 2,91.923 2.423,91.5 5.32,91.5 6.581,92.761 6.581,95.606 6.096,96.091 6.096,97.003
  lines w0.2: 8.229,2.537 99.6,2.537 ; 101,2.537 119.984,2.537 ; 122.216,2.537 219.3,2.537
  lines w0.254: 0.051,97.993 219.9,97.993
KeepOutLayer:
  circle w0.254: c213.7,70.8 r2.002
  region: 206.037,48.55 219.475,48.55 219.475,51.45 206.037,51.45
  lines w0.2: 218,100 220.039,97.961 220.039,2.55
  lines w0.203: 0.2,93.1 0.2,99.75 0.45,100 19,100 218,100

## Other copper
L1:
  pour cut-out: 162.125,15.2 159.025,15.2 159.025,10.436 162.125,10.436
  pour cut-out: 137.7,8.613 134.6,8.613 134.6,2.848 137.7,2.848
  pour cut-out: 141.7,9.1 144.8,9.1 144.8,14.3 146.4,14.3 146.4,15.9 144.8,15.9 142.7,15.9 141.7,14.9
L6:
  rectangle net GND: -1.8,71.075 -1,71.6
  rectangle net GND: -1.9,69.346 -1.164,69.9
  rectangle net GND: -0.8,70.9 -0.2,71.5
  pour cut-out: 122.994,55.262 123.611,55.88 123.611,87.233 122.994,87.85 120.883,87.85 119.581,87.85 118.963,87.233 118.963,55.88 119.581,55.262
  pour cut-out: 109.494,55.262 110.111,55.88 110.111,87.233 109.494,87.85 107.383,87.85 106.081,87.85 105.463,87.233 105.463,55.88 106.081,55.262
  pour cut-out: 119.581,14.262 118.963,14.88 118.963,42.941 118.972,42.95 121.625,42.95 121.931,43.256 123.611,43.256 123.611,14.88 122.994,14.262
  pour cut-out: 109.494,14.262 110.111,14.88 110.111,42.941 110.103,42.95 107.45,42.95 106.8,43.6 106.824,43.624 106.824,46.292 107.383,46.85 106.081,46.85 105.463,46.233 105.463,14.88 106.081,14.262

## Silkscreen, mask and mechanical layers (free items; w line width, h text height)
TopOverlay:
  drawing of 1255 lines, arcs and shapes, not listed
  text "PORTB" at 9.154,93.854 h1.52
  text "P" at 9.354,91.534 h1.52
  text "N" at 13.154,91.534 h1.52
  text "GND" at 158.9,87.7 h1
  text "P3V3" at 158.9,85.3 h1
  text "P3V3MP" at 158.9,82.8 h1
  text "P5V0" at 158.9,80.4 h1
  text "Switch Matrix 32:2  / V1.2 / WUT ISE 2026" at 127.4,78.9 h1.02
  text "P12V0" at 158.9,77.967 h1
  text "PORTA" at 133.952,74.752 h0.89
  text "PORTB" at 153.552,74.652 h0.89
  text "P" at 9.354,73.154 h1.52
  text "N" at 13.154,73.154 h1.52
  text "CH31" at 126.006,73.152 h0.76
  text "CH30" at 125.752,71.552 h0.76
  text "PORTA" at 9.154,70.754 h1.52
  text "CH29" at 125.752,70.152 h0.76
  text "CH28" at 125.752,68.652 h0.76
  text "CH27" at 125.752,67.152 h0.76
  text "CH26" at 125.752,65.552 h0.76
  text "P12V in" at 208.452,65.052 h0.89
  text "CH25" at 125.752,64.052 h0.76
  text "CH24" at 125.752,62.552 h0.76
  text "DAC 24-31" at 103.005,61.7 h2.03 r90
  text "DAC 16-23" at 116.2,61.7 h2.03 r90
  text "CH23" at 125.752,61.052 h0.76
  text "CH22" at 125.752,59.552 h0.76
  text "CH21" at 126.006,58.052 h0.76
  text "CH20" at 125.752,56.652 h0.76
  text "CH19" at 125.879,55.052 h0.76
  text "CH18" at 125.879,53.552 h0.76
  text "CH17" at 125.879,52.052 h0.76
  text "EEM 0" at 195.2,50.7 h1.52 r90
  text "CH16" at 125.879,50.552 h0.76
  text "CH15" at 125.879,49.052 h0.76
  text "CH14" at 125.879,47.552 h0.76
  text "CH13" at 125.879,46.052 h0.76
  text "CH12" at 125.879,44.552 h0.76
  text "CH11" at 126.133,43.052 h0.76
  text "CH10" at 125.879,41.552 h0.76
  text "CH9" at 126.514,40.152 h0.76
  text "CH8" at 126.514,38.552 h0.76
  text "CH7" at 126.514,37.052 h0.76
  text "GND" at 172.1,36.96 h1
  text "CH6" at 126.514,35.552 h0.76
  text "SDA" at 172.1,34.76 h1
  text "CH5" at 126.514,34.052 h0.76
  text "CH4" at 126.514,32.552 h0.76
  text "SCL" at 172.1,32.56 h1
  text "CH3" at 126.514,31.052 h0.76
  text "P3V3_MP" at 168.101,30.36 h1
  text "CH2" at 126.514,29.552 h0.76
  text "CH1" at 126.768,28.052 h0.76
  text "CH0" at 126.514,26.552 h0.76
  text "DAC 0-7" at 103.005,23.137 h2.03 r90
  text "DAC 8-15" at 115.8,22 h2.03 r90
BottomOverlay:
  drawing of 1237 lines, arcs and shapes, not listed
  text "Switch Matrix 32:2  / V1.2 / WUT ISE 2026" at 148.762,78.777 h1.02
TopSolder:
  rectangle: 5.004,0.565 219.973,2.362
  rectangle: 3.354,0.565 5.531,2.337
  rectangle: 1.177,0.565 3.354,2.362
BottomSolder:
  rectangle: 4.923,0.565 219.973,2.362
  rectangle: 3.354,0.565 5.531,2.337
  rectangle: 1.177,0.565 3.354,2.362
Mechanical1:
  drawing of 415 lines, arcs and shapes, not listed
  text "Layer" at 50.104,161.734 h1.52
  text "Name" at 60.516,161.734 h1.52
  text "Material" at 82.608,161.734 h1.52
  text "Thickness" at 104.446,161.734 h1.52
  text "Constant" at 120.952,161.734 h1.52
  text "Board Layer Stack" at 135.426,161.734 h1.52
  text "TopOverlay" at 60.516,158.686 h1.52
  text "TopSolder" at 60.516,155.638 h1.52
  text "Solder Resist" at 82.608,155.638 h1.52
  text "0.010mm" at 104.446,155.638 h1.52
  text "3.5" at 120.952,155.638 h1.52
  text "1" at 50.104,152.59 h1.52
  text "L1" at 60.516,152.59 h1.52
  text "0.035mm" at 104.446,152.59 h1.52
  text "Dielectric1" at 60.516,149.542 h1.52
  text "FR-4" at 82.608,149.542 h1.52
  text "0.200mm" at 104.446,149.542 h1.52
  text "4.8" at 120.952,149.542 h1.52
  text "2" at 50.104,146.494 h1.52
  text "P2" at 60.516,146.494 h1.52
  text "CF-004" at 82.608,146.494 h1.52
  text "0.035mm" at 104.446,146.494 h1.52
  text "Dielectric 1" at 60.516,143.446 h1.52
  text "PP-006" at 82.608,143.446 h1.52
  text "0.400mm" at 104.446,143.446 h1.52
  text "4.1" at 120.952,143.446 h1.52
  text "3" at 50.104,140.398 h1.52
  text "L3" at 60.516,140.398 h1.52
  text "CF-004" at 82.608,140.398 h1.52
  text "0.035mm" at 104.446,140.398 h1.52
  text "Dielectric 2" at 60.516,137.35 h1.52
  text "PP-006" at 82.608,137.35 h1.52
  text "0.200mm" at 104.446,137.35 h1.52
  text "4.1" at 120.952,137.35 h1.52
  text "4" at 50.104,134.302 h1.52
  text "P4" at 60.516,134.302 h1.52
  text "CF-004" at 82.608,134.302 h1.52
  text "0.035mm" at 104.446,134.302 h1.52
  text "Dielectric2" at 60.516,131.254 h1.52
  text "Core-042" at 82.608,131.254 h1.52
  text "0.400mm" at 104.446,131.254 h1.52
  text "4.6" at 120.952,131.254 h1.52
  text "5" at 50.104,128.206 h1.52
  text "L5" at 60.516,128.206 h1.52
  text "CF-004" at 82.608,128.206 h1.52
  text "0.035mm" at 104.446,128.206 h1.52
  text "Dielectric3" at 60.516,125.158 h1.52
  text "FR-4" at 82.608,125.158 h1.52
  text "0.200mm" at 104.446,125.158 h1.52
  text "4.8" at 120.952,125.158 h1.52
  text "6" at 50.104,122.11 h1.52
  text "L6" at 60.516,122.11 h1.52
  text "0.035mm" at 104.446,122.11 h1.52
  text "BottomSolder" at 60.516,119.062 h1.52
  text "Solder Resist" at 82.608,119.062 h1.52
  text "0.010mm" at 104.446,119.062 h1.52
  text "3.5" at 120.952,119.062 h1.52
  text "BottomOverlay" at 60.516,116.014 h1.52
  text "Total board thickness:" at 50.104,112.966 h1.52
  text "1.630mm" at 104.446,112.966 h1.52
Mechanical4:
  lines w0.508: -2.544,-15.25 -2.544,114.162

## Text inside footprints (layer, text, board x,y; h text height)
J1: TopOverlay "36" at 2.689,21.311 h1 r270; TopOverlay "1" at 4.489,20.411 h1 r270; TopOverlay "2" at 6.439,21.311 h1 r270; TopOverlay "35" at 0.539,20.411 h1 r270; TopOverlay "34" at 6.374,67.261 h1 r270; TopOverlay "67" at 0.675,66.161 h1 r270; TopOverlay "68" at 2.424,67.061 h1 r270; TopOverlay "33" at 4.424,66.461 h1 r270; Mechanical14 "36" at 2.689,21.311 h1.02 r270; Mechanical14 "1" at 4.489,20.411 h1.02 r270; Mechanical14 "2" at 6.439,21.311 h1.02 r270; Mechanical14 "35" at 0.539,20.411 h1.02 r270; Mechanical14 "34" at 6.374,67.261 h1.02 r270; Mechanical14 "67" at 0.675,66.161 h1.02 r270; Mechanical14 "68" at 2.424,67.061 h1.02 r270; Mechanical14 "33" at 4.424,66.461 h1.02 r270; Mechanical8 "PCB Edge" at -2.165,47.131 h1.2 r270
J4: TopOverlay "26" at 118.62,45.161 h1.02 r90; Mechanical14 "26" at 118.62,45.161 h1.02 r90
J5: TopOverlay "26" at 118.62,86.161 h1.02 r90; Mechanical14 "26" at 118.62,86.161 h1.02 r90
J6: TopOverlay "30" at 203.147,25.185 h1.02 r270; Mechanical14 "30" at 203.147,25.185 h1.02 r270
J7: TopOverlay "26" at 105.12,86.161 h1.02 r90; Mechanical14 "26" at 105.12,86.161 h1.02 r90
J8: TopOverlay "26" at 105.12,45.161 h1.02 r90; Mechanical14 "26" at 105.12,45.161 h1.02 r90
J10: TopOverlay "1" at 205.45,75.275 h1.2 r270; Mechanical14 "1" at 205.45,75.275 h1.2 r270
J13: TopOverlay "A" at 219.1,2.9 h1 r90; TopOverlay "B" at 217.7,2.9 h1 r90; TopOverlay "C" at 216.4,2.8 h1 r90; TopOverlay "D" at 214.3,2.3 h1 r90; TopOverlay "E" at 212.9,2.3 h1 r90; TopOverlay "F" at 211.5,2.3 h1 r90; TopOverlay "G" at 210.1,2.3 h1 r90; TopOverlay "H" at 208.7,2.3 h1 r90; TopOverlay "I" at 207.3,2.55 h1 r90; TopOverlay "J" at 205.9,2.3 h1 r90; TopOverlay "K" at 204.5,2.3 h1 r90; TopOverlay "L" at 203.1,2.3 h1 r90; TopOverlay "1" at 198.05,4.15 h1 r90; TopOverlay "2" at 198.05,6.15 h1 r90; TopOverlay "3" at 198.05,8.15 h1 r90; TopOverlay "4" at 198.05,10.15 h1 r90; TopOverlay "5" at 198.05,12.15 h1 r90; TopOverlay "6" at 198.05,14.15 h1 r90; DrillDrawing "PRESS-FIT TECHNOLOGY" at 218.75,17 h1 r180; DrillDrawing "Diam. 0.5mm +/-0.05" at 218.75,18.5 h1 r180; Mechanical14 "A" at 218.5,1.3 h1 r90; Mechanical14 "B" at 217.1,1.3 h1 r90; Mechanical14 "D" at 214.3,2.3 h1 r90; Mechanical14 "E" at 212.9,2.3 h1 r90; Mechanical14 "F" at 211.5,2.3 h1 r90; Mechanical14 "G" at 210.1,2.3 h1 r90; Mechanical14 "H" at 208.7,2.3 h1 r90; Mechanical14 "I" at 207.3,2.55 h1 r90; Mechanical14 "J" at 205.9,2.3 h1 r90; Mechanical14 "K" at 204.5,2.3 h1 r90; Mechanical14 "L" at 203.1,2.3 h1 r90; Mechanical14 "1" at 198.05,4.15 h1 r90; Mechanical14 "2" at 198.05,6.15 h1 r90; Mechanical14 "3" at 198.05,8.15 h1 r90; Mechanical14 "4" at 198.05,10.15 h1 r90; Mechanical14 "5" at 198.05,12.15 h1 r90; Mechanical14 "6" at 198.05,14.15 h1 r90; Mechanical8 "Top Surface of Mother Board" at 232.35,5.125 h0.5 r90; Mechanical8 "Edge of Daugher Card" at 220.85,6.275 h0.5 r90
LD1: Mechanical8 "K" at -1.25,67.117 h0.5 r270
LD10: Mechanical8 "K" at -1.25,15.417 h0.5 r270